# Altium PCB MB.PcbDoc (part 3 of 10)
Units mm, origin at the board's own origin, x right, y up, seen from the top; angles counter-clockwise.
Board outline 203 x 72 mm, 6 copper layers (Top Layer, Layer 3, Layer 1, Layer 2, Layer 4, Bottom Layer), stack 1.52 mm thick; 653 components, 568 nets, 2914 pads, 2399 vias.
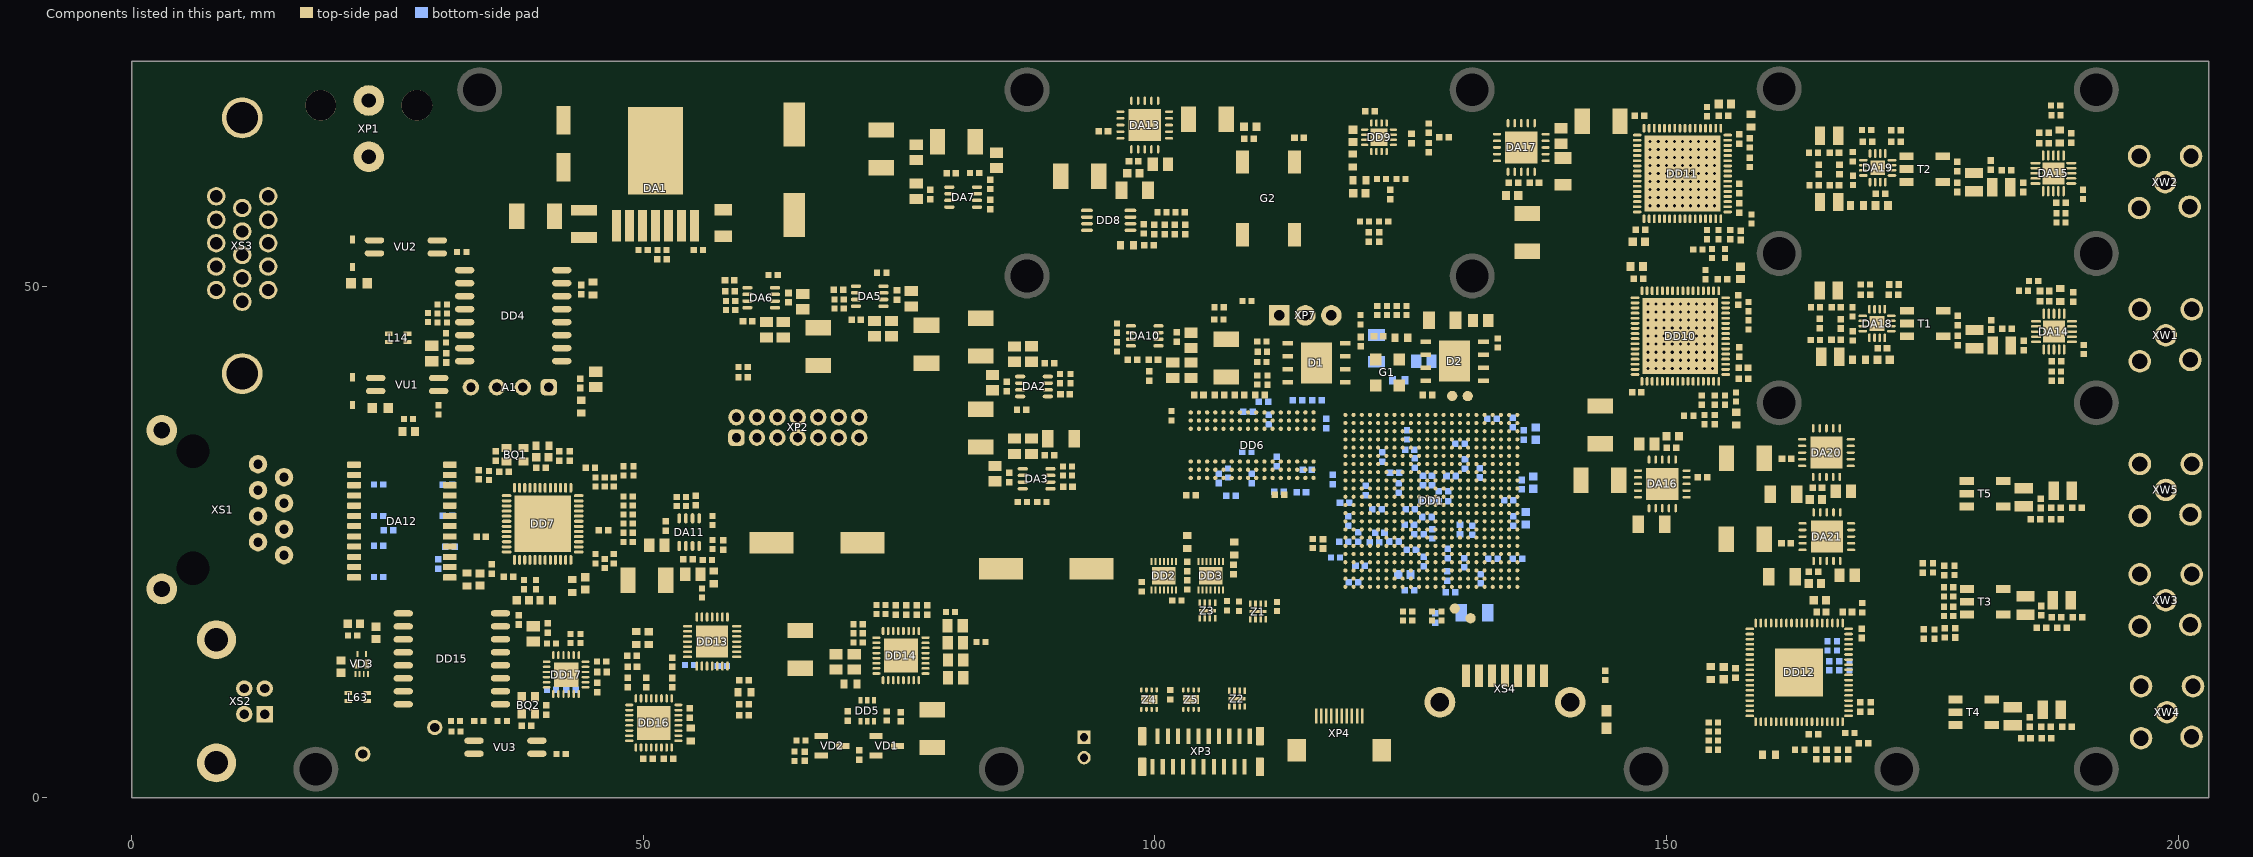
[diagram p6: the components of this part, seen from the top]

## Part data (continued)
R70: library part "Чип резистор 0402 120 кОм, 5%", "ЧИП-резистор", Tolerance=±5%, PackageReference=0402, TKE="100 ppm/°С"
R80: library part "Чип резистор 0402 12.4 кОм, 1%", "ЧИП-резистор", Tolerance=±1%, PackageReference=0402, TKE="100 ppm/°С"
R82 R84 R85 R86: library part "Чип резистор 0402 75 Ом, 5%", "ЧИП-резистор", Tolerance=±5%, PackageReference=0402, TKE="100 ppm/°С"
R87 R178: library part "Чип резистор 0402 330 Ом, 5%", "ЧИП-резистор", Tolerance=±5%, PackageReference=0402, TKE="100 ppm/°С"
R89 R90 R92 R93 R99 R113 R115 R116 R117 R118 R128 R129 R130 R135 R136 R140 R141 R142 R143 R184 R185 R186 R187 R188: library part "Чип резистор 0402 100 Ом, 5%", "ЧИП-резистор", Tolerance=±5%, PackageReference=0402, TKE="100 ppm/°С"
R101 R103 R105 R107: library part "Чип резистор 0402 130 Ом, 5%", "ЧИП-резистор", Tolerance=±5%, PackageReference=0402, TKE="100 ppm/°С"
R102 R104 R106 R108: library part "Чип резистор 0402 82 Ом, 5%", "ЧИП-резистор", Tolerance=±5%, PackageReference=0402, TKE="100 ppm/°С"
R120 R126 R169: library part "Чип резистор 0402 200 Ом, 5%", "ЧИП-резистор", Tolerance=±5%, PackageReference=0402, TKE="100 ppm/°С"
R124 R127: library part "Чип резистор 0402 *", "ЧИП-резистор", Tolerance=±5%, PackageReference=0402, TKE="100 ppm/°С"
R131 R132 R133 R134: library part "Чип резистор 0402 10 Ом, 5%", "ЧИП-резистор", Tolerance=±5%, PackageReference=0402, TKE="100 ppm/°С"
R137 R138: library part "Чип резистор 0402 47 Ом, 5%", "ЧИП-резистор", Tolerance=±5%, PackageReference=0402, TKE="100 ppm/°С"
R145: library part "Чип резистор 0402 2.7 кОм, 5%", "ЧИП-резистор", Tolerance=±5%, LatestRevisionDate=17-Jul-2002, LatestRevisionNote="Re-released for DXP Platform.", PackageReference=0402, Published=8-Jun-2000, Publisher="Altium Limited", TKE="100 ppm/°С"
R147 R148 R149 R150: library part "Чип резистор 0402 49,9 Ом, 1%", "ЧИП-резистор", Tolerance=±1%, PackageReference=0402, TKE="100 ppm/°С"
R152 R153 R154 R157 R173 R174: library part "Чип резистор 0402 0 Ом", "ЧИП-резистор", Tolerance=±5%, PackageReference=0402, TKE="100 ppm/°С"
R164: library part "Чип резистор 0402 12 кОм, 5%", "ЧИП-резистор", Tolerance=±5%, PackageReference=0402, TKE="100 ppm/°С"
R165 R166 R167 R168: library part "Чип резистор 0402 51 кОм, 5%", "ЧИП-резистор", Tolerance=±5%, PackageReference=0402, TKE="100 ppm/°С"
R171: library part "Чип резистор 0402 2,2 кОм, 5%", "ЧИП-резистор", Tolerance=±5%, PackageReference=0402, TKE="100 ppm/°С"
R175 R176 R177: library part "Чип резистор 0402 470 кОм, 5%", "ЧИП-резистор", Tolerance=±5%, PackageReference=0402, TKE="100 ppm/°С"
T1 T2 T3: library part "ЧИП трансформатор TC4-1T+", "RF Transformer 50Ω 0.5 to 300 MHz 1:4", Manufacturer=minicircuits, ManufacturerPartNumber=ADT2-1T+, ComponentLink1Description=datasheet, ComponentLink1URL=https://ww2.minicircuits.com/pdfs/ADT2-1T+.pdf
T4 T5: library part "ЧИП трансформатор MABA-011062", "1:2 Step up Flux Coupled Balun Transformer 1 – 300 MHz", Manufacturer=MACOM, ComponentLink1Description=datasheet, ComponentLink1URL=https://cdn.macom.com/datasheets/MABA-011062.pdf, ManufacturerPartNumber=MABA-011062
VD1 VD2: library part "ЧИП диод BAS16", "High-speed switching diodes", Manufacturer=Nexperia, Power/Voltage=100В, ComponentLink1Description=datasheet, ComponentLink1URL=https://assets.nexperia.com/documents/data-sheet/BAS16_SER.pdf, ManufacturerPartNumber=BAS16
VD3: library part "Диодная сборка RClamp1255P", "Low Capacitance RClamp Surge Protection for uUSB Interfaces", Manufacturer=SEMTECH, PackageReference=SLP1510N6
VU1 VU2 VU3: library part "Оптопара транзисторная PC3H7J00000F", "Mini-falt Package, General Purpose Half Pitch Photocouper", ComponentLink1Description="Manufacturer Link", ComponentLink1URL=http://www.vishay.com/optocouplers/list/product-83640/, ComponentLink2Description=Datasheet, ComponentLink2URL=http://www.vishay.com/docs/83640/83640.pdf, PackageReference=SOP-4
X1 X2 X3 X4: library part "Соединение под пайку", "Соединитель"